# Altium PCB Interface.PcbDoc
Units mm, origin at the board's own origin, x right, y up, seen from the top; angles counter-clockwise.
Board outline 30.5 x 82 mm, 2 copper layers (Top Layer, Bottom Layer), stack 1.271 mm thick; 75 components, 43 nets, 233 pads, 361 vias.
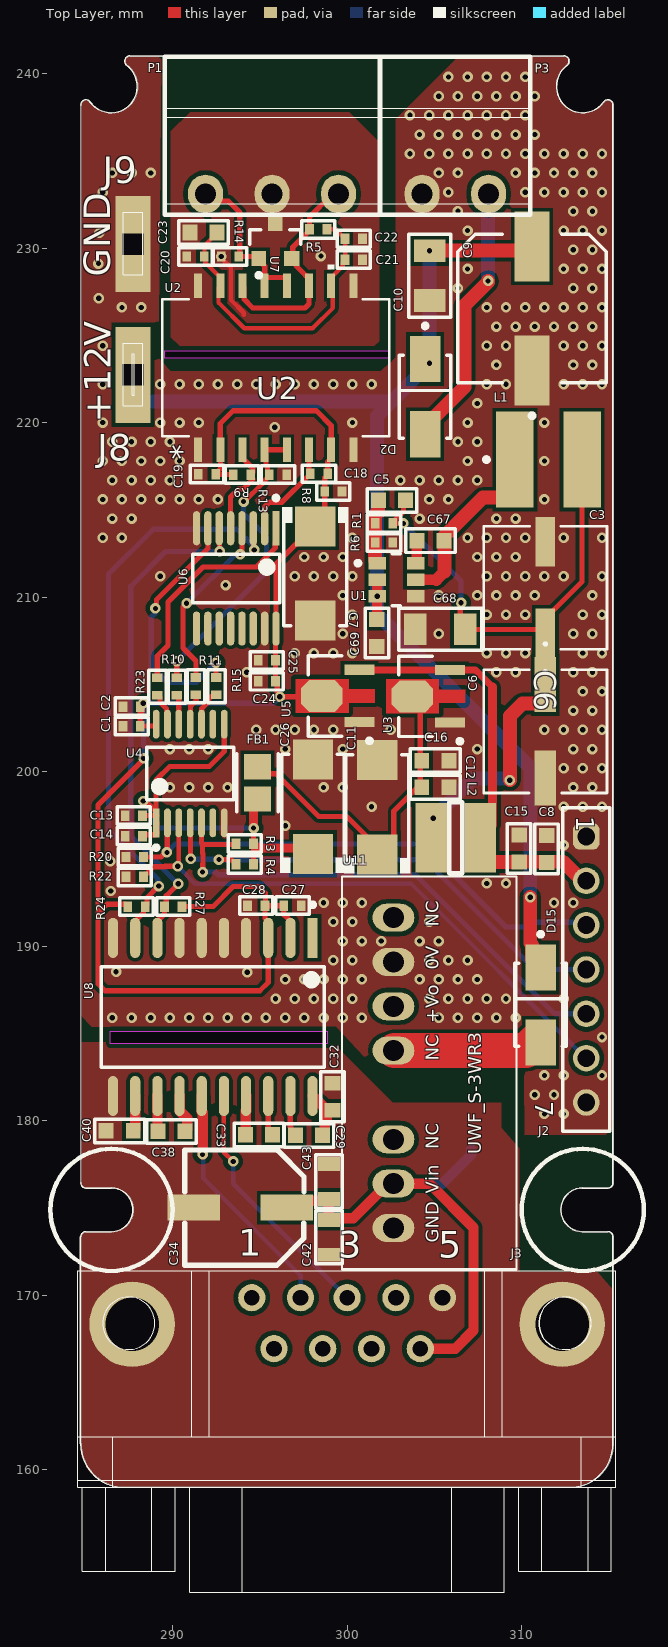
[diagram p0: Top Layer view]
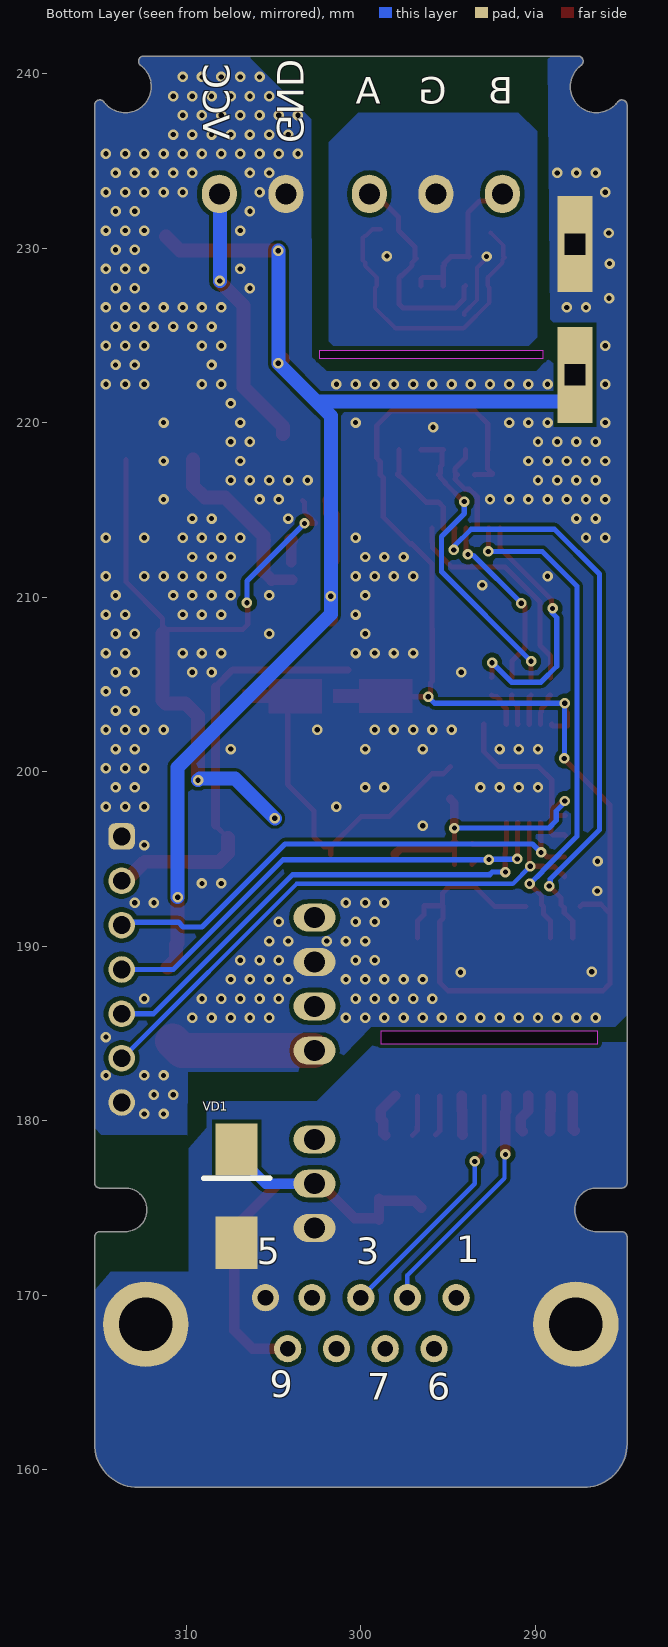
[diagram p1: Bottom Layer view, seen from below]
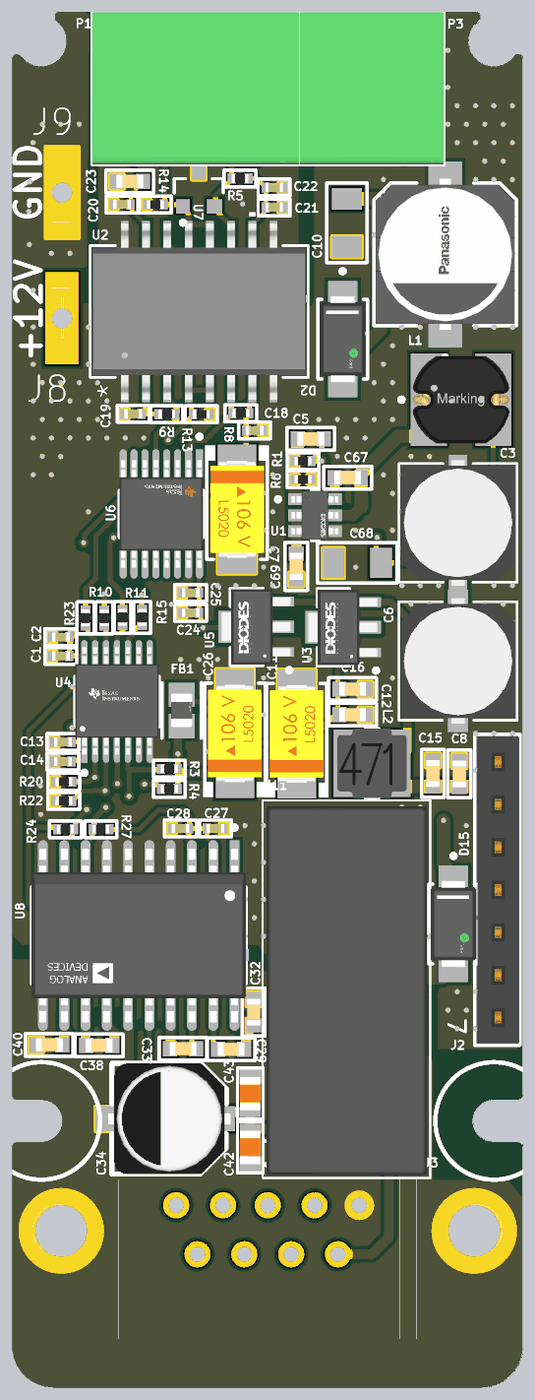
[diagram p2: 3D render of the assembled board from above, using the file's embedded part models]

## Layer stack, top to bottom
Top Solder: solder mask 0.0102, Solder Resist, Dk 3.5
Top Layer: signal copper 0.0356
Dielectric 1: dielectric 1.2, FR-4, Dk 4.8
Bottom Layer: signal copper 0.0356
Bottom Solder: solder mask 0.0102, Solder Resist, Dk 3.5

## Board outline
284.75,173.35 cw(c285.05,173.35) 285.05,173.65 286.5,173.65 ccw(c286.5,174.9) 286.5,176.15 285.05,176.15 cw(c285.05,176.45) 284.75,176.45 284.75,238.183 cw(c285.05,238.183) 285.292,238.361 ccw(c286.5,239.25) 287.389,240.458 cw(c287.567,240.7) 287.567,241 312.433,241 cw(c312.433,240.7) 312.611,240.458 ccw(c313.5,239.25) 314.708,238.361 cw(c314.95,238.183) 315.25,238.183 315.25,176.45 cw(c314.95,176.45) 314.95,176.15 313.5,176.15 ccw(c313.5,174.9) 313.5,173.65 314.95,173.65 cw(c314.95,173.35) 315.25,173.35 315.25,161.5 cw(c312.75,161.5) 312.75,159 287.25,159 cw(c287.25,161.5) 284.75,161.5
cut-out: 289.56,223.672 289.56,224.13 302.387,224.13 302.387,223.672
cut-out: 286.436,184.429 286.436,185.141 298.856,185.141 298.856,184.429
cut-out: 289.56,223.672 289.56,224.13 302.387,224.13 302.387,223.672

## Design rules (kind name [scope] priority, off if disabled: settings)
Clearance Clearance_1 [All] p1: gap=0.254 ignorepadtopadclearanceinfootprint=FALSE except(0.2: Arc-Fill Arc-Poly Arc-Region Track-Fill Track-Poly Track-Region SMDPad-SMDPad SMDPad-THPad SMDPad-Fill SMDPad-Poly SMDPad-Region)
Clearance [All] p2: gap=0.254 ignorepadtopadclearanceinfootprint=TRUE except(0.15: Via-Fill Via-Poly Via-Region; 0.2: Arc-Fill Arc-Poly Arc-Region Track-Fill Track-Poly Track-Region SMDPad-SMDPad SMDPad-Fill SMDPad-Poly SMDPad-Region)
ComponentClearance [All] p1: gap=-10 collisioncheckmode=3 verticalgap=0.1 showdistances=FALSE
HoleSize [All] p1: absolutevalues=TRUE maxlimit=4 minlimit=0.025 maxpercent=80.000 minpercent=20.000
PlaneClearance [All] p1: clearance=0.2
PlaneConnect [All] p1: planeconnectstyle=Direct reliefexpansion=0.508 reliefentries=4 reliefconductorwidth=0.254 reliefairgap=0.254
PolygonConnect [All] p1: connectstyle=Direct reliefconductorwidth=0.254 reliefentries=4 polygonreliefangle="90 Angle" airgapwidth=0.254
RoutingVias [All] p1: holewidth=0.3 width=0.6 viastyle="Through Hole" minholewidth=0.3 minwidth=0.6 maxholewidth=0.711 maxwidth=1.27
SilkToSilkClearance [All] p1: silktosilkclearance=0.1
SilkToSolderMaskClearance [IsPad] p1: minsilkscreentomaskgap=0.05 clearancetoexposedcopper=TRUE
SolderMaskExpansion SolderMaskExpansion_1 [All] p1: expansion=0.102 istentingtop=FALSE
SolderMaskExpansion Tented_Vias [IsVia] p2: expansion=0.102 istentingtop=TRUE
SupplyNets "Schematic Supply Nets_10" [InNet('VCC_2')] p1: voltage=0.000
SupplyNets "Schematic Supply Nets_8" [InNet('GND_ISOL')] p2: voltage=0.000
SupplyNets "Schematic Supply Nets_5" [InNet('3v3')] p3: voltage=0.000
SupplyNets "Schematic Supply Nets_4" [InNet('VCC')] p4: voltage=0.000
SupplyNets "Schematic Supply Nets_2" [InNet('+5V')] p5: voltage=0.000
SupplyNets "Schematic Supply Nets_1" [InNet('GND')] p6: voltage=0.000
SupplyNets "Schematic Supply Nets" [InNet('GND_2')] p7: voltage=0.000
Width [All] p1: maxlimit=3 minlimit=0.254 preferedwidth=0.254 minimp=50.000000 maximp=50.000000 favimp=50.000000
24 further rules are at their usual default settings.

## Components (designator, comment, footprint, x,y, rotation, side; value= is the part's Value field where it differs from the comment)
C1 "0.1uF 16V" CAP-0402 287.655,202.616 r180 top locked
C2 "2.2uF 16V" CAP-0402 287.655,203.733 r180 top locked
C3 "100uF 16V" CAP_A765EB_KEM-L 311.353,210.541 r90 top locked
C5 "100pF" CAP-0603 302.565,215.544 r180 top locked
C6 "100uF 16V" CAP_A765EB_KEM 311.353,202.311 r270 top locked
C7 "100uF_16V" CAP-TAN-C 298.171,211.353 r270 top locked
C8 "0.1uF" CAP-0603 311.429,195.58 r270 top locked
C9 "330uF 25V" CAP_SMD_Size_G 310.591,226.543 r90 top locked
C10 "10uF 50V" CAP-1206 304.724,228.422 r270 top locked
C11 "47uF_16V" CAP-TAN-C 301.727,197.968 r90 top locked
C12 "0.1uF" CAP-0603 305.054,199.111 r180 top locked
C13 "0.1uF 16V" CAP-0402 287.782,197.485 r180 top locked
C14 "2.2uF 16V" CAP-0402 287.782,196.317 r180 top locked
C15 "0.1uF" CAP-0603 309.855,195.605 r270 top locked
C16 "0.1uF" CAP-0603 305.054,200.635 r180 top locked
C18 "2.2uF 16V" CAP-0402 299.212,216.052 r0 top locked
C19 "0.1uF 16V" CAP-0402 291.973,217.043 r180 top locked
C20 "10nF" CAP-0402 291.313,229.514 r180 top locked
C21 "100nF" CAP-0402 300.38,229.337 r0 top locked
C22 "1nF" CAP-0402 300.38,230.53 r0 top locked
C23 "1uF" CAP-0603 291.77,230.886 r180 top locked
C24 "2.2uF 16V" CAP-0402 295.402,205.181 r180 top locked
C25 "0.1uF 16V" CAP-0402 295.402,206.375 r180 top locked
C26 "100uF_16V" CAP-TAN-C 298.044,197.993 r90 top locked
C27 "2.2uF 16V" CAP-0402 296.875,192.329 r0 top locked
C28 "0.1uF 16V" CAP-0402 294.792,192.329 r180 top locked
C29 "0.1uF 16V" CAP-0603 297.815,179.172 r0 top locked
C32 "0.1uF 16V" CAP-0603 299.161,181.381 r270 top locked
C33 "0.1uF 16V" CAP-0603 294.945,179.197 r0 top locked
C34 "100uF 50V" CAP_SMD_SIZE_D 294.132,175.031 r0 top locked
C38 "0.1uF 16V" CAP-0603 289.941,179.4 r0 top locked
C40 "0.1uF 16V" CAP-0603 286.969,179.426 r0 top locked
C42 "1 uF 25V" CAP-0805 298.958,173.33 r270 top locked
C43 "100 nF 25V" CAP-0805 298.958,176.53 r90 top locked
C67 "100nF" CAP-0603 304.775,213.233 r0 top locked
C68 "22uF 16V" CAP-1206 305.336,208.153 r180 top locked
C69 "100 nF 50V" CAP-0603 301.701,207.95 r270 top locked
D2 "SS14" DO-214-AC 304.47,221.488 r90 top locked
D15 "SS14" DO-214-AC 311.08,186.639 r90 top locked
FB1 "BLM21PG221SN1D" FP-BLM21-0_2-t0_85-e0_5-IPC_A 294.869,199.365 r90 top locked
J2 "61300711821" 61300711821 313.7,188.671 r270 top locked
J3 "'DB9公头" DB9-1 300,165.3 r0 top locked
J8 "1.2x3.7mm" Pad_conn_1.2x3.7mm#1 287.757,222.733 r90 top locked
J9 "1.2x3.7mm" Pad_conn_1.2x3.7mm#2 287.731,230.226 r90 top locked
L1 "12µH, 2A" WE-PD2_5848 311.531,217.881 r0 top locked
L2 "220uH" Coil_4.5x4.5_mm 306.222,196.215 r0 top locked
P1 "15EDGRS_3.81-3" 15EDGRC-3.81-3 295.7,233.1 r90 top locked
P3 "15EDGRC3_5-2" 16EDGRC_3.81-2 306.2,233.1 r90 top locked
R1 "270K" RES-0402 302.108,214.224 r180 top locked
R3 "10K" RES-0402 294.132,195.885 r180 top locked
R4 "10K" RES-0402 294.132,194.691 r180 top locked
R5 "10K" RES-0402 298.348,231.064 r0 top locked
R6 "30.1 K" RES-0402 302.108,213.131 r180 top locked
R8 "10K" RES-0402 298.391,217.068 r0 top locked
R9 "10K" RES-0402 293.98,217.018 r180 top locked
R10 "33R" RES-0402 290.246,204.876 r270 top locked
R11 "33R" RES-0402 291.338,204.902 r270 top locked
R13 "10K" RES-0402 296.037,217.018 r180 top locked
R14 "10K" RES-0402 293.294,229.514 r0 top locked
R15 "33R" RES-0402 292.506,204.902 r270 top locked
R20 "10K" RES-0402 287.832,195.115 r0 top locked
R22 "10K" RES-0402 287.832,193.972 r0 top locked
R23 "33R" RES-0402 289.128,204.876 r270 top locked
R24 "10K" RES-0402 287.934,192.278 r180 top locked
R27 "10K" RES-0402 290.043,192.278 r0 top locked
U1 "AP63200WU-7" FP-TSOT26-MFG 302.819,210.998 r0 top locked
U2 "ADM2687E" RI_16_2_ADI-L 295.91,223.139 r90 top locked
U3 "AMS1117-3.3" SOT-89 304.114,204.318 r90 top locked
U4 "TXU0304QPWRQ1" FP-PW0014A-IPC_B 291.008,199.898 r90 top locked
U5 "AMS1117" SOT-89 298.933,204.343 r90 top locked
U6 "TMUX1574PWR" TSSOP-16-A 293.649,211.074 r270 top locked
U7 "PSM712-LF-T7" PRKT-SOT23-3_V 295.885,230.403 r90 top locked
U8 "ADM3251EARWZ-REEL" FP-RW-20-IPC_B 292.303,185.953 r270 top locked
U11 "UWF1212S-3WR3" UWF_S-3WR3 302.65,182.753 r90 top locked
VD1 "SMBJ15A" DO-214AA 307.111,177.978 r270 bottom locked

## Footprints (in the part's own frame and the unit in brackets; to place one, negate y for a bottom-side part, rotate by r counter-clockwise, add the part's x,y. Pads: shape width x height; smd on the part's side, far side on the other; paste and mask are expansions set on the pad)
15EDGRC-3.81-3 [mm] "15EDGRC-3.81-3"
  oval 2.2x2 hole 1.2: 1(0,3.81) 2(0,0) 3(0,-3.81)
  silkscreen extent -1.19,-6.17 7.85,6.15, body extent -1.2,-6.15 7.87,6.15, height 7.2
16EDGRC_3.81-2 [mm] "16EDGRC_3.81-2"
  oval 2.2x2 hole 1.2: 1(0,1.905) 2(0,-1.905)
  silkscreen extent -1.19,-4.29 7.85,4.29, body extent -1.2,-4.3 7.87,4.3, height 7.2
61300711821 [mm] "Socket Header, Pitch 2.54 mm, THT, Vertical, single row, 7p"
  rrect50% 1.52x1.52 hole 1.02: 1(-7.62,0)
  round 1.52 hole 1.02: 2(-5.08,0) 3(-2.54,0) 4(0,0) 5(2.54,0) 6(5.08,0) 7(7.62,0)
  silkscreen extent -9.27,-1.35 9.27,1.35, body extent -9.14,-1.2 9.14,1.3, height 8.55
CAP-0402 [mm]
  rect 0.5x0.6 smd: 1(-0.5,0) 2(0.5,0)
  silkscreen extent -0.95,-0.5 0.95,0.5, body extent -0.52,-0.27 0.53,0.28, height 0.55
CAP-0603 [mm]
  rect 0.85x0.9 smd: 1(-0.775,0) 2(0.775,0)
  silkscreen extent -1.43,-0.67 1.43,0.67, body extent -0.8,-0.4 0.8,0.4, height 0.8
CAP-0805 [mm]
  rect 0.8x1.25 smd mask+0.015: 1(-1,0) 2(1,0)
  silkscreen extent -1.52,-0.76 1.52,0.76, body extent -1,-0.62 1,0.63, height 0.8
CAP-1206 [mm]
  rect 1.3x1.8 smd: 1(-1.425,0) 2(1.425,0)
  silkscreen extent -2.37,-1.2 2.37,1.2, body extent -1.68,-0.87 1.67,0.87, height 0.95
CAP-TAN-C [mm]
  rect 2.3x2.3 smd: 1(-2.7,0) 2(2.7,0)
  silkscreen extent -3.8,-1.9 3,1.9, body extent -2.9,-1.6 2.9,1.6, height 2.6
CAP_A765EB_KEM [mm]
  rect 3.143x1.213 smd paste+0 mask+0: 1(-2.675,0) 2(2.675,0)
  silkscreen extent -5.08,-3.53 3.53,3.53, body extent -3.75,-3.4 3.75,3.4, height 6.05
CAP_A765EB_KEM-L [mm]
  rect 2.843x1.113 smd paste+0 mask+0: 1(-2.625,0) 2(2.625,0)
  silkscreen extent -4.88,-3.53 3.53,3.53, body extent -3.75,-3.4 3.75,3.4, height 6.05
CAP_SMD_SIZE_D [mm] "CAP_SMD_SIZE_D"
  rect 3x1.5 smd: 1(2.413,0) 2(-2.921,0)
  silkscreen extent -3.43,-3.3 3.4,3.3, body extent -3.65,-3.3 3.65,3.3, height 7.7
CAP_SMD_Size_G [mm]
  rect 4x2 smd paste+0 mask+0: 1(3.55,0) 2(-3.55,0)
  silkscreen extent -6.27,-4.25 4.25,4.25, body extent -5.8,-4.5 5.8,4.5, height 0.25
Coil_4.5x4.5_mm [mm]
  rect 1.8x4 smd: 1(-1.397,0) 2(1.397,0)
  silkscreen extent -0.38,-2.03 0.38,2.03, body extent -2.07,-2.07 2.07,2.07, height 2.8
DB9-1 [mm] "DB9-1  PCB"
  round 1.56 hole 0.9: 1(-5.461,4.572) 2(-2.667,4.572) 3(0,4.572) 4(2.794,4.572) 5(5.461,4.572) 6(-4.191,1.651) 7(-1.397,1.651) 8(1.397,1.651) 9(4.191,1.651)
  round 4.9 hole 3.07: MH1(-12.319,3.048) MH2(12.319,3.048)
  body extent -15.41,-12.4 15.41,6, height 12.5
DO-214-AC [mm]
  rect 2.65x1.75 smd paste+0 mask+0: 1(-2.15,0) 2(2.15,0)
  silkscreen extent -2.37,-1.48 4.17,1.48, body extent -2.6,-1.36 2.6,1.36, height 2.5
DO-214AA [mm]
  rect 3x2.4 smd: 1(-0.381,0) 2(4.953,0)
  silkscreen extent 1.27,-1.91 1.27,1.9, body extent -0.53,-1.85 5.07,2.1, height 2.65
FP-BLM21-0_2-t0_85-e0_5-IPC_A [mm]
  rect 1.455x1.556 smd paste+0 mask+0: 1(-0.926,0) 2(0.926,0)
  silkscreen extent -1.65,-1.18 1.65,1.18, body extent -1,-0.63 1,0.63, height 1.05
FP-PW0014A-IPC_B [mm]
  rect 1.655x0.381 smd paste+0 mask+0: 1(-2.825,1.95)
  rrect100% 1.655x0.381 smd paste+0 mask+0: 2(-2.825,1.3) 3(-2.825,0.65) 4(-2.825,0) 5(-2.825,-0.65) 6(-2.825,-1.3) 7(-2.825,-1.95) 8(2.825,-1.95) 9(2.825,-1.3) 10(2.825,-0.65) 11(2.825,0) 12(2.825,0.65) 13(2.825,1.3) 14(2.825,1.95)
  silkscreen extent -4.37,-2.5 1.5,2.5, body extent -3.9,-2.75 3.9,2.75, height 0.25
FP-RW-20-IPC_B [mm]
  rect 2.298x0.582 smd paste+0 mask+0: 1(-4.528,5.715)
  rrect100% 2.298x0.582 smd paste+0 mask+0: 2(-4.528,4.445) 3(-4.528,3.175) 4(-4.528,1.905) 5(-4.528,0.635) 6(-4.528,-0.635) 7(-4.528,-1.905) 8(-4.528,-3.175) 9(-4.528,-4.445) 10(-4.528,-5.715) 11(4.528,-5.715) 12(4.528,-4.445) 13(4.528,-3.175) 14(4.528,-1.905) 15(4.528,-0.635) 16(4.528,0.635) 17(4.528,1.905) 18(4.528,3.175) 19(4.528,4.445) 20(4.528,5.715)
  silkscreen extent -6.55,-6.4 2.88,6.4, body extent -5.93,-6.65 5.93,6.65, height 0.25
FP-TSOT26-MFG [mm]
  rect 1x0.7 smd paste+0 mask+0: 1(-1.099,0.95) 2(-1.099,0) 3(-1.099,-0.95) 4(1.099,-0.95) 5(1.099,0) 6(1.099,0.95)
  silkscreen extent -2.32,-1.5 0.22,1.5, body extent -1.4,-1.45 1.4,1.45, height 1
Pad_conn_1.2x3.7mm#1 [mm]
  rect 5.5x2 hole 1.2 square: 1(0,0.026)
Pad_conn_1.2x3.7mm#2 [mm]
  rect 5.5x2 hole 1.2 square: 1(0,0)
PRKT-SOT23-3_V [mm] "SOT23, 3-Leads, Body 2.92x1.3mm, Pitch 0.94mm"
  rect 0.84x0.84 smd: 1(-1,0.94) 3(1,0)
  rect 0.84x0.9 smd: 2(-1,-0.94)
  silkscreen extent -2.09,-1.46 0.65,1.46, body extent -0.65,-1.46 0.65,1.46, height 1.17
RES-0402 [mm]
  rect 0.5x0.6 smd: 1(-0.5,0) 2(0.5,0)
  silkscreen extent -0.95,-0.5 0.95,0.5, body extent -0.5,-0.25 0.5,0.25, height 0.35
RI_16_2_ADI-L [mm]
  rect 1.41x0.46 smd paste+0 mask+0: 1(-4.7,4.445) 2(-4.7,3.175) 3(-4.7,1.905) 4(-4.7,0.635) 5(-4.7,-0.635) 6(-4.7,-1.905) 7(-4.7,-3.175) 8(-4.7,-4.445) 9(4.7,-4.445) 10(4.7,-3.175) 11(4.7,-1.905) 12(4.7,-0.635) 13(4.7,0.635) 14(4.7,1.905) 15(4.7,3.175) 16(4.7,4.445)
  silkscreen extent -3.93,-6.5 5.91,6.5, body extent -5.26,-6.38 5.26,6.38, height 2.64
SOT-89 [mm]
  rect 0.58x1.73 smd paste+0 mask+0: 1(-1.5,-1.781) 3(1.5,-1.781)
  oct 1.827x2.394 smd paste+0 mask+0: 2(0,0.381)
  Top Layer region: -0.38,-2.646 -0.38,-1.146 -0.967,-1.146 -0.967,1.884 0.967,1.884 0.967,-1.146 0.38,-1.146 0.38,-2.646
  silkscreen extent -2.7,-2.47 2.3,1.15, body extent -2.25,-2.42 2.25,1.68, height 1.6
TSSOP-16-A [mm] "TSSOP-16 pacadge"
  rect 1.955x0.421 smd paste+0 mask+0: 1(-2.875,2.275)
  rrect100% 1.955x0.421 smd paste+0 mask+0: 2(-2.875,1.625) 3(-2.875,0.975) 4(-2.875,0.325) 5(-2.875,-0.325) 6(-2.875,-0.975) 7(-2.875,-1.625) 8(-2.875,-2.275) 9(2.875,-2.275) 10(2.875,-1.625) 11(2.875,-0.975) 12(2.875,-0.325) 13(2.875,0.325) 14(2.875,0.975) 15(2.875,1.625) 16(2.875,2.275)
  silkscreen extent -4.73,-2.5 1.4,2.5, body extent -4.35,-3 4.35,3, height 0.25
UWF_S-3WR3 [mm]
  oval 1.6x2.4 hole 1.2: 1(-8.89,0) 2(-6.35,0) 3(-3.81,0) 5(1.27,0) 6(3.81,0) 7(6.35,0) 8(8.89,0)
  silkscreen extent -11.25,-7.05 11.25,2.95, body extent -11.09,-6.87 10.91,2.73, height 12
WE-PD2_5848 [mm] "SMD Power Inductor, 2-Leads, body 5.8x5.2mm"
  rect 2.15x5.5 smd: 1(-1.925,0) 2(1.925,0)
  silkscreen extent -3.67,-0.12 -3.42,0.12, body extent -2.9,-2.6 2.89,2.6, height 4.48

## Part data
C1 C13 C19 C25 C28: library part CAP-NON-POLAR, "0.1uF 16V X7R / GRM155R71C104KA88D"
C2 C14 C18 C24 C27: library part CAP-NON-POLAR, "2.2uF 16V X5R GRM155R61C225KE11D"
C3 C6: library part CAP_POL_SMD, "KEMET A765EB107M1CLAE025 /  / 100uF 16V 25mΩ 125mA@120Hz ±20% SMD,D6.3xL6mm Aluminum"
C5: library part CAP-NON-POLAR, "100pF 50V  C0G   Murata GRM1885C1H101JA01D"
C7 C9 C26: library part CAP_POL_SMD
C8 C12 C15 C16 C20 C21 C22 C23 C29 C32 C33 C38 C40: library part CAP-NON-POLAR
C10: library part CAP-NON-POLAR, "10uF 50V X7R  Yageo  CC1206KKX7R9BB106"
C11: library part CAP-POLAR
C34: library part CAP_POL_SMD, "100uF 50V  JVJ50V100M6x8"
C42: library part CAP-NON-POLAR, "1 uF 25V X7R"
C43: library part CAP-NON-POLAR, "100 nF 25V X7R"
C67: library part CAP-NON-POLAR, "100nF  50V  X7R  Murata GRM188R71H104KA93D"
C68: library part CAP-NON-POLAR, "22uF 16V   X7R   Murata GRM31CZ71C226ME15L"
C69: library part CAP-NON-POLAR, "100 nF 50V  X7R  GCM188R71H104KA57J"
FB1: "Chip Ferrite Bead, 0805, 220Ω @ 100MHz, 0.045Ω, 25%, 2A"
J2: "WR-PHD Socket Header, THT, Vertical, pitch 2.54mm, 1 Row, 7P", Contact Resistance=20mΩ, Manufacturer="Wurth Elektronik", Operating Temperature Max=125°C, Operating Temperature Min=-40°C, Rated Current=3A, Withstanding Voltage=500V, Working Voltage=250V, Category="Board-to-Board Connectors", ComponentLink1Description="Website Link", ComponentLink1URL=https://www.we-online.com/redexpert/article/61300711821?ad, ComponentLink2Description="Datasheet Link", ComponentLink2URL=https://www.we-online.com/redexpert/spec/61300711821?ad, Gender="Socket Header", Manufacturer Part Number=61300711821, Match Code=WR-PHD, Mount="Through Hole", Number of Pins=7, Number of Rows=1, Orientation=Vertical, Packaging=Tray, Pitch=2.54mm
J3: library part DB9, "D-DMR009PM-D002  Ckmtw /  / 9P/弯插/公"
J8 J9: library part Klema_15_A
L1: library part 744774112, "WE-PD2 SMT Power Inductor, size 5848, 12µH, 2A, 0.11Ω", Case/Size Code=5848, DC Resistance=0.082Ω, DC Resistance Max=0.11Ω, Inductance=12µH, Manufacturer="Wurth Elektronik", Operating Temperature Max=125°C, Operating Temperature Min=-40°C, Rated Current=2A, Saturation Current=1.94A, Self Resonant Frequency=24MHz, Category="Unshielded Power Inductors", ComponentLink1Description="Website Link", ComponentLink1URL=https://www.we-online.com/redexpert/article/744774112?ad, ComponentLink2Description="Datasheet Link", ComponentLink2URL=https://www.we-online.com/redexpert/spec/744774112?ad, Height=4.5mm, Length=5.8mm, Manufacturer Part Number=744774112, Match Code=WE-PD2, Mount="Surface Mount", Packaging="Tape and Reel", Width=5.2mm, Simulation ModelName=5848_744774112_12u, Simulation ModelText=".subckt 5848_744774112_12u 1 2 / Rp 1 2 22000 / Cp 1 2 3p / Rs 1 N3 0.065 / L1 N3 2 12u / .ends 5848_744774112_12u", Simulation PortMap=(1:1),(2:2)
L2: library part Coil
R1 R3 R4 R5 R8 R9 R10 R11 R13 R14 R15 R20 R22 R23 R24 R27: library part RES-CONST
R6: library part RES-CONST, "30,1 K, 1%"
U1: "AP63200WU-7  IC REG BUCK ADJUSTABLE 2A TSOT26"
U3: library part AMS1117
U4: "Translation - Voltage Levels Automotive four chan nel unidirectional"
U7: library part CMP-2000-07553-1, "TVS Array - Asymmetrical Data Line Protector, 600 W, 7.5 V, -55 to 150 degC, 3-Pin SOT23, RoHS, Tape and Reel", Capacitance=75pF, Case\/Package=SOT-23, Clamping Voltage=17V, Current=20uA, Manufacturer="Protek Devices", Max Operating Temperature=150degC, Min Breakdown Voltage=7.5V, Min Operating Temperature=-55degC, Package Description="3-Pin Small Outline Transistor, Body 2.92 x 1.3 mm, Pitch 0.94 mm", Package Reference=SOT23-3, Power Dissipation=600W, Voltage=12V, Working Voltage=7V, Datasheet URL=www.protekdevices.com/xyz/documents/datasheets/psm712.pdf, Datasheet Version=10/2013, Depth=1.4mm, Direction=Bidirectional, Element Configuration=Dual, Lead Free=LeadFree, Leakage Current=20uA, Length=3.04mm, Manufacturer URL=http://www.protekdevices.com/, Mounting Technology=SurfaceMount, Number of Pins=3, Packaging=TapeandReel, Radiation Hardening=No, RoHSCompliant=True
U8: "DGTL ISO 2.5KV 2CH RS232 20SOIC"
U11: library part UWF_S-3WR3
VD1: library part ESD_Unidirect

## Via types
v1: diameter 0.6, hole 0.3, Top Layer to Bottom Layer, tented both sides, 361 vias

## Nets (pads, with @x,y where several pads share a name; then routed paths per layer and width w, separated by ;. In a path a pad name is that pad's centre, name@x,y a point inside that pad or via, vN(x,y) a via of type N, cw(c..) or ccw(c..) an arc to the next point about the centre after c; other vN are vias at no path point)
3v3: C13.1 C14.1 C26.1 FB1.1 R3.1 R4.1 U4.1 U4.8 | length 26.5
  Top Layer w0.3: C14.1 288.36,196.395 289.017,196.395 289.098,196.476 U4.1@289.098,197.073 ; C13.1 U4.1@289.098,197.485 ; v1(288.315,198.323) 288.373,198.266 288.502,198.266 U4.1@289.058,197.71 ; U4.1 U4.1@289.058,197.71 ; U4.8 292.958,201.162 292.1,200.304 289.839,200.304 289.058,199.523 U4.1@289.058,197.71 ; R4.1 R3.1@294.632,195.635 ; R3.1 294.632,196.766 v1(294.64,196.774)
  Top Layer w0.5: R3.1 294.882,195.635 297.701,195.635 C26.1 ; v1(294.64,196.774) 294.64,198.21 FB1.1
  Bottom Layer w0.3: v1(288.315,198.323) 288.315,198.242 288.8,197.757 288.8,197.201 289.228,196.774 v1(294.64,196.774)
+5V: C1.1 C2.1 C7.1 C18.1 C19.1 C24.1 C25.1 C27.1 C28.1 R8.2 R9.2 R24.2 R27.2 U2.2 U2.7 U4.14 U5.2 U6.16 U8.2 U8.3 | length 83.6
  Top Layer w0.3: R24.2 287.307,192.405 286.258,192.405 285.725,191.872 ; C2.1@288.258,203.828 288.258,203.469 288.155,203.366 C1.1 289.02,202.616 289.058,202.653 U4.14 ; v1(288.341,200.762) 288.341,200.708 285.725,198.092 285.725,191.872 ; R27.2 292.329,192.278 293.472,193.421 294.945,193.421 295.326,193.04 295.326,192.362 C28.1 ; R9.2 293.467,217.03 292.486,217.03 C19.1 292.473,217.093 292.739,217.359 292.739,218.435 U2.2 292.735,219.939 293.472,220.675 298.247,220.675 299.085,219.837 299.085,217.964 298.891,217.77 298.891,217.018 298.712,216.839 C18.1 ; U8.2 296.748,191.44 296.375,191.813 C27.1 C28.1 ; U5.2 298.272,204.343 298.221,204.292 v1(296.139,204.292) 296.139,204.373 296.002,204.51 296.002,205.081 C24.1 C25.1 295.902,208.176 U6.16 295.924,211.901 297.077,213.053 297.171,213.053 298.712,214.595 C18.1@298.712,215.952 ; 285.725,191.872 285.725,187.858 286.131,187.452 294.996,187.452 295.478,187.935 295.478,191.416 295.292,191.601 C28.1
  Bottom Layer w0.3: v1(288.341,200.762) 288.328,200.774 288.328,203.904 v1(288.315,203.917) 295.763,203.917 v1(296.139,204.292)
GND: C1.2 C2.2 C3.2 C6.2 C7.2 C8.1 C9.2 C10.2 C11.2 C12.1 C13.2 C14.2 C15.1 C16.1 C18.2 C19.2 C24.2 C25.2 C26.2 C27.2 C28.2 C68.2 C69.2 J2.1 J2.7 J9.1 P3.1 R6.1 R13.1 R20.1 R22.1 U1.4 U2.1 U2.8 U3.1 U4.7 U5.1 U6.8 U6.15 U8.4 U8.5 U8.6 U8.7 U8.10 U11.7
  other v1: 311.3,180.4 312.4,180.4 310.75,181.5 311.85,181.5 311.3,182.6 312.4,182.6 314.6,182.6 314.6,184.8 286.55,185.9 287.65,185.9 288.75,185.9 289.85,185.9 290.95,185.9 292.05,185.9 293.15,185.9 294.25,185.9 295.35,185.9 296.45,185.9 297.55,185.9 298.65,185.9 299.75,185.9 300.85,185.9 305.25,185.9 306.35,185.9 307.45,185.9 308.55,185.9 309.65,185.9 295.9,187 297,187 298.1,187 299.2,187 300.3,187 304.7,187 305.8,187 306.9,187 308,187 309.1,187 312.4,187 296.45,188.1 297.55,188.1 298.65,188.1 299.75,188.1 300.85,188.1 304.15,188.1 305.25,188.1 306.35,188.1 307.45,188.1 294.284,188.519 286.766,188.544 299.2,189.2 300.3,189.2 304.7,189.2 305.8,189.2 306.9,189.2 299.75,190.3 300.85,190.3 301.95,190.3 304.15,190.3 305.25,190.3 299.2,191.4 300.3,191.4 304.7,191.4 298.65,192.5 299.75,192.5 300.85,192.5 311.85,192.5 312.95,192.5 286.461,193.167 308,193.6 309.1,193.6 286.436,194.869 312.4,195.8 296.45,196.9 301.4,198 312.4,198 313.5,198 314.6,198 289.85,199.1 290.95,199.1 292.05,199.1 293.15,199.1 298.65,199.1 299.75,199.1 312.95,199.1 314.05,199.1 312.4,200.2 313.5,200.2 314.6,200.2 289.85,201.3 290.95,201.3 292.05,201.3 296.45,201.3 299.75,201.3 307.45,201.3 312.95,201.3 314.05,201.3 294.8,202.4 295.9,202.4 297,202.4 298.1,202.4 299.2,202.4 302.5,202.4 311.3,202.4 312.4,202.4 313.5,202.4 314.6,202.4 312.95,203.5 314.05,203.5 313.5,204.6 314.6,204.6 294.25,205.7 308.55,205.7 309.65,205.7 312.95,205.7 314.05,205.7 297,206.8 298.1,206.8 299.2,206.8 300.3,206.8 308,206.8 309.1,206.8 310.2,206.8 313.5,206.8 314.6,206.8 299.75,207.9 305.25,207.9 312.95,207.9 314.05,207.9 300.3,209 308,209 309.1,209 310.2,209 313.5,209 314.6,209 299.75,210.1 305.25,210.1 307.45,210.1 308.55,210.1 309.65,210.1 310.75,210.1 314.05,210.1 293.04,210.693 289.3,211.2 297,211.2 298.1,211.2 299.2,211.2 300.3,211.2 308,211.2 309.1,211.2 310.2,211.2 311.3,211.2 312.4,211.2 314.6,211.2 297.55,212.3 298.65,212.3 299.75,212.3 307.45,212.3 308.55,212.3 309.65,212.3 286,213.4 287.1,213.4 300.3,213.4 306.9,213.4 308,213.4 309.1,213.4 310.2,213.4 312.4,213.4 314.6,213.4 286.55,214.5 287.65,214.5 304.15,214.5 308.55,214.5 309.65,214.5 286,215.6 287.1,215.6 288.2,215.6 289.3,215.6 290.4,215.6 291.5,215.6 292.6,215.6 304.7,215.6 305.8,215.6 311.3,215.6 286.55,216.7 287.65,216.7 288.75,216.7 289.85,216.7 303.05,216.7 304.15,216.7 305.25,216.7 306.35,216.7 307.45,216.7 286,217.8 287.1,217.8 288.2,217.8 289.3,217.8 290.4,217.8 306.9,217.8 311.3,217.8 286.55,218.9 287.65,218.9 288.75,218.9 289.85,218.9 306.35,218.9 307.45,218.9 295.859,219.735 286,220 289.3,220 290.4,220 291.5,220 300.3,220 306.9,220 311.3,220 307.45,221.1 286,222.2 289.3,222.2 290.4,222.2 291.5,222.2 292.6,222.2 293.7,222.2 294.8,222.2 295.9,222.2 297,222.2 298.1,222.2 299.2,222.2 300.3,222.2 301.4,222.2 308,222.2 309.1,222.2 312.4,222.2 313.5,222.2 314.6,222.2 308.55,223.3 312.95,223.3 314.05,223.3 286,224.4 308,224.4 309.1,224.4 312.4,224.4 313.5,224.4 314.6,224.4 308.55,225.5 309.65,225.5 310.75,225.5 311.85,225.5 312.95,225.5 314.05,225.5 287.1,226.6 288.2,226.6 308,226.6 309.1,226.6 310.2,226.6 311.3,226.6 312.4,226.6 313.5,226.6 314.6,226.6 285.775,227.127 306.35,227.7 312.95,227.7 314.05,227.7 306.9,228.8 312.4,228.8 313.5,228.8 314.6,228.8 285.75,229.108 312.95,229.9 314.05,229.9 285.801,230.861 306.9,231 312.4,231 313.5,231 314.6,231 306.35,232.1 312.95,232.1 314.05,232.1 286,233.2 305.8,233.2 310.2,233.2 311.3,233.2 312.4,233.2 313.5,233.2 314.6,233.2 286.55,234.3 287.65,234.3 288.75,234.3 305.25,234.3 306.35,234.3 309.65,234.3 310.75,234.3 311.85,234.3 312.95,234.3 314.05,234.3 303.6,235.4 304.7,235.4 305.8,235.4 306.9,235.4 308,235.4 309.1,235.4 310.2,235.4 311.3,235.4 312.4,235.4 313.5,235.4 314.6,235.4 304.15,236.5 305.25,236.5 306.35,236.5 307.45,236.5 308.55,236.5 309.65,236.5 310.75,236.5 303.6,237.6 304.7,237.6 305.8,237.6 306.9,237.6 308,237.6 309.1,237.6 310.2,237.6 305.25,238.7 306.35,238.7 307.45,238.7 308.55,238.7 309.65,238.7 310.75,238.7 305.8,239.8 306.9,239.8 308,239.8 309.1,239.8 310.2,239.8
GND_2: C32.1 C34.2 C40.1 C42.2 C43.2 J3.5 J3.MH1 J3.MH2 U8.11 U11.1 VD1.2
GND_ISOL: C20.2 C21.2 C22.2 C23.2 P1.2 R14.1 U2.9 U2.16 U7.3 | length 3.9
  Top Layer w0.254: R14.1@292.794,229.464 v1(292.794,229.514) 292.917,229.391 292.917,229.303 293.346,228.873 293.346,227.024 294.081,226.289 294.081,226.162
  other v1: 298.501,229.54
NetC3_1: C3.1 C5.1 C6.1 C68.1 L1.2 L2.1 R1.1 | length 40.1
  Top Layer w0.3: R1.1 v1(303.225,214.224) ; R1.1@302.608,214.274 303.228,214.894 303.228,215.433 C5.1 ; v1(306.527,209.677) 306.476,209.626 306.476,208.438 C68.1 311.158,208.153 311.353,208.348 311.353,208.781 313.456,210.884 L1.2
  Top Layer w0.8: v1(309.321,199.517) 309.321,203.2 310.036,203.914 311.197,203.914 311.353,204.071 311.353,204.936 C3.1
  Bottom Layer w0.3: v1(303.225,214.224) 306.527,210.922 v1(306.527,209.677)
  Bottom Layer w0.8: v1(304.927,197.333) 307.213,199.619 309.22,199.619 v1(309.321,199.517)
NetC5_2: C5.2 R1.2 R6.2 U1.1 | length 3.7
  Top Layer w0.8: U1.1@301.719,212.002 301.608,212.114 R6.2 301.608,214.698 301.765,214.856 301.765,215.519 C5.2
NetC11_1: C11.1 C12.2 C16.2 FB1.2 U3.2 | length 19.3
  Top Layer w0.3: FB1.2 295.272,199.887 295.921,199.887 298.374,197.434 299.974,197.434 C11.1@301.727,195.682 ; C11.1 301.727,195.707 302.114,195.707 302.675,196.268 302.675,197.748 304.19,199.263 304.19,200.635 304.19,203.86 U3.2
NetC20_1: C20.1 C21.1 C22.1 C23.1 R5.2 U2.10 U2.15 | length 18
  Top Layer w0.254: C20.1@291.762,229.464 291.885,229.341 291.885,229.164 292.735,228.314 U2.15 292.632,227.736 292.632,226.874 294.107,225.4 298.018,225.4 299.187,226.568 299.187,227.737 U2.10 299.085,228.314 299.757,228.986 299.757,229.164 299.88,229.287 299.88,230.58 299.757,230.703 299.707,230.703 299.347,231.064 R5.2 ; C20.1 291.828,229.53 291.828,230.145 292.545,230.861 C23.1
NetC29_1: C29.1 U8.19 | length 2.4
  Top Layer w0.3: U8.19 296.748,179.647 296.765,179.631 296.765,179.447 C29.1
NetC29_2: C29.2 C32.2 U8.20 | length 2.7
  Top Layer w0.6: U8.20 298.846,180.598 298.846,180.101 298.715,179.97 298.715,179.297 C29.2
NetC33_1: C33.1 U8.17 | length 2.2
  Top Layer w0.6: C33.1 294.199,179.226 294.199,180.576 294.208,180.585 U8.17
NetC33_2: C33.2 U8.18 | length 2.3
  Top Layer w0.3: U8.18 295.478,179.439 C33.2
NetC34_1: C34.1 C42.1 C43.1 J3.9 U11.2 VD1.1 | length 28.8
  Top Layer w0.6: C34.1 296.944,175.43 298.858,175.43 C43.1 ; C42.1 299.058,174.43 300.344,174.43 302.317,176.403 302.717,176.403 304.724,176.403 307.238,173.888 307.238,167.996 306.194,166.951 J3.9 ; C42.1 C43.1
  Bottom Layer w0.6: U11.2@302.717,176.403 305.456,176.403 307.111,178.059 VD1.1
NetC38_1: C38.1 U8.13 | length 2
  Top Layer w0.6: U8.13 289.128,180.585 289.137,180.576 289.137,179.429 C38.1
NetC38_2: C38.2 U8.14 | length 2.3
  Top Layer w0.6: U8.14 290.398,180.585 290.845,180.139 290.845,179.819 290.841,179.815 290.841,179.525 C38.2
NetC40_2: C40.2 U8.12 | length 2
  Top Layer w0.6: C40.2 287.849,179.531 287.849,181.416 U8.12
NetC67_1: C67.1 U1.6 | length 1.2
  Top Layer w0.6: U1.6@303.997,212.002 C67.1@303.997,213.231
  Top Layer w0.8: C67.1@303.997,213.231 C67.1
NetC67_2: C67.2 L1.1 U1.5 | length 10.6
  Top Layer w0.6: U1.5 305.105,210.998
  Top Layer w0.7: 305.105,210.998 305.587,211.48
  Top Layer w0.8: 305.587,211.48 305.587,212.143 305.575,212.156 305.575,213.208 305.547,213.235 305.575,213.263 305.575,213.5 307.772,215.697 308.931,215.697 309.606,216.372 L1.1
NetD2_1: D2.1 P3.2 | length 15.3
  Top Layer w0.8: D2.1 304.47,219.788 306.73,222.049 306.73,226.72 308.077,228.067 v1(308.077,228.117)
  Bottom Layer w0.8: v1(308.077,228.117) 308.077,233.072 P3.2
NetD15_1: D15.1 U11.5 | length 8.3
  Top Layer w2: U11.5@302.717,184.023 310.236,184.023 D15.1@310.794,184.582
NetJ2_3: J2.3 R20.2 U4.2 | length 29.5
  Top Layer w0.3: R20.2 289.334,195.115 289.596,195.377 v1(289.677,195.377) ; v1@289.692,195.361 289.692,197.057 U4.2
  Bottom Layer w0.3: v1(289.677,195.377) 290.158,195.858 304.344,195.858 309.093,191.11 310.18,191.11 310.452,191.382 313.494,191.382 J2.3@313.665,191.211
NetJ2_4: J2.4 R4.2 U4.4 | length 28.4
  Top Layer w0.3: U4.4 291.023,197.057 291.023,195.02 v1(291.039,195.004) ; v1(292.659,194.97) 293.353,194.97 293.482,194.841 293.532,194.841 293.632,194.741 R4.2
  Bottom Layer w0.3: v1(291.039,195.004) 291.056,194.987 292.63,194.987 292.659,194.958 304.46,194.958 310.748,188.671 J2.4@313.665,188.671
NetJ2_5: J2.5 R3.2 U4.5 | length 30.1
  Top Layer w0.3: U4.5 291.658,195.895 291.719,195.834 ; v1@291.712,194.261 291.732,194.281 291.732,194.702 291.743,194.713 291.743,195.296 291.712,195.327 291.712,195.834 293.581,195.834 R3.2
  Bottom Layer w0.3: v1(291.719,194.254) 292.469,194.254 292.619,194.104 303.902,194.104 311.876,186.131 J2.5@313.665,186.131
NetJ2_6: J2.6 R22.2 U4.3 | length 32.7
  Top Layer w0.254: v1(290.298,194.579) 290.358,194.638 U4.3
  Top Layer w0.3: R22.2 288.332,194.022 288.432,194.122 288.482,194.122 288.921,194.561 289.563,194.561 289.581,194.579 v1(290.298,194.579)
  Bottom Layer w0.254: v1(290.298,194.579) 291.304,193.573 303.682,193.573 J2.6@313.665,183.591
NetJ3_2: J3.2 U8.15 | length 13.9
  Top Layer w0.6: U8.15 291.668,180.523 291.719,180.472 v1(291.719,178.079)
  Bottom Layer w0.254: v1(291.719,178.079) 291.77,178.029 291.77,176.708 297.333,171.145 J3.2
NetJ3_3: J3.3 U8.16 | length 14.5
  Top Layer w0.254: U8.16 292.938,178.206 v1(293.472,177.673)
  Bottom Layer w0.254: v1(293.472,177.673) 293.472,176.4 J3.3
NetP1_1: P1.1 R14.2 U2.12 U2.13 U7.1 | length 10.4
  Top Layer w0.3: P1.1@291.694,232.994 291.999,232.689 293.193,232.689 293.855,232.027 293.855,229.525 R14.2@293.819,229.489 ; R14.2 294.834,229.514 U7.1 ; U7.1@294.97,229.378 295.215,229.133 295.215,229.018 295.275,228.958 295.275,228.417 U2.13 ; U2.13@295.275,228.314 296.465,228.314 296.545,228.234 U2.12
  Bottom Layer w0.254: P1.1@291.694,232.994 P1.1@291.694,233.69
NetP1_3: P1.3 R5.1 U2.11 U2.14 U7.2 | length 13.4
  Top Layer w0.3: U2.14 294.085,227.759 294.085,227.072 294.589,226.568 297.586,226.568 297.815,226.797 297.815,228.314 297.712,228.417 297.633,228.417 297.097,228.953 297.097,228.983 297.071,229.009 297.071,229.157 U7.2 296.89,229.469 296.89,230.056 297.848,231.014 297.848,231.778 299.065,232.994 P1.3@299.314,232.994
  Bottom Layer w0.254: P1.3@299.314,232.994 P1.3@299.314,233.74
NetR8_1: R8.1 U2.6 U6.2 | length 6.1
  Top Layer w0.3: U6.2 295.274,215.166 295.551,215.443 296.266,215.443 297.741,216.918 297.791,216.918 297.891,217.018 R8.1 297.815,217.145 U2.6
NetR9_1: R9.1 U2.3 U6.5 | length 5.5
  Top Layer w0.3: U6.5 293.324,215.727 293.776,216.179 294.03,216.179 294.608,216.757 294.58,216.786 R9.1@294.58,217.018 ; U2.3 294.005,217.964 294.608,217.361 294.608,217.168 294.608,217.146 R9.1
NetR10_1: R10.1 R13.2 U2.4 U2.5 | length 17.7
  Top Layer w0.3: R10.1 v1(290.246,206.324) ; v1(294.068,215.475) 294.11,215.475 295.162,216.528 295.162,216.57 295.437,216.844 295.437,216.918 R13.2 295.437,217.118 295.437,217.498 295.355,217.58 295.355,218.359 U2.4 U2.5
  Bottom Layer w0.3: v1(290.246,206.324) 295.382,211.461 295.382,213.476 294.068,214.79 v1(294.068,215.475)
NetR10_2: R10.2 U4.12 | length 1.7
  Top Layer w0.3: R10.2 290.258,204.376 290.358,204.276 U4.12
NetR11_1: R11.1 U6.4 | length 10.4
  Top Layer w0.3: v1(290.805,209.652) 290.601,209.448 290.601,207.086 291.338,206.35 R11.1 ; v1(293.864,212.447) 293.864,212.528 293.974,212.638 U6.4
  Bottom Layer w0.3: v1(290.805,209.652) 293.542,212.389 293.807,212.389 v1(293.864,212.447)
NetR11_2: R11.2 U4.11 | length 1.8
  Top Layer w0.3: U4.11 291.023,202.739 291.023,203.749 291.363,204.089 291.363,204.376 R11.2
NetR15_1: R15.1 U6.7 | length 14.7
  Top Layer w0.3: v1(289.016,209.357) 289.074,209.414 289.074,209.847 292.024,212.798 U6.7 ; v1(292.481,206.248) 292.481,205.427 R15.1
  Bottom Layer w0.3: v1(289.016,209.357) 289.029,209.344 289.029,209.096 288.773,208.839 288.773,206.045 289.687,205.13 291.363,205.13 v1(292.481,206.248)
NetR15_2: R15.2 U4.10 | length 2.1
  Top Layer w0.3: U4.10 291.673,202.739 291.673,203.615 292.042,203.984 292.042,204.126 292.218,204.302 292.406,204.302 R15.2
NetR23_1: R23.1 U6.1 | length 13.2
  Top Layer w0.3: R23.1 289.128,206.629 289.738,207.239 289.738,209.728 291.744,211.734 294.792,211.734 295.889,212.831 295.889,213.122 295.924,213.157 U6.1
NetR23_2: R23.2 U4.13 | length 1.9
  Top Layer w0.3: R23.2 289.178,204.376 289.278,204.276 289.278,203.981 289.652,203.607 289.652,203.438 289.708,203.383 U4.13
NetR24_1: R24.1 U6.3 U8.9 | length 33.9
  Top Layer w0.3: U8.9 287.858,191.44 288.341,191.922 288.341,192.184 R24.1 288.534,192.378 288.534,192.781 v1(289.202,193.449) ; U6.3 294.648,213.926 294.648,212.734 v1(294.678,212.703)
  Bottom Layer w0.3: v1(289.202,193.449) 289.149,193.501 289.149,193.857 286.334,196.672 286.334,211.328 288.9,213.893 293.677,213.893 294.615,212.956 294.615,212.848 294.678,212.785 v1(294.678,212.703)
NetR27_1: R27.1 U6.6 U8.8 | length 29.1
  Top Layer w0.3: U8.8 289.128,191.44 289.535,191.846 289.535,192.27 289.643,192.378 289.643,192.894 v1(290.331,193.583) ; U6.6 292.689,213.934 292.689,212.631 v1(292.705,212.616)
  Bottom Layer w0.3: v1(290.331,193.583) 290.299,193.583 289.594,194.287 289.594,194.319 287.611,196.303 287.611,210.624 289.604,212.616 v1(292.705,212.616)
VCC: C9.1 C10.1 C69.1 D2.2 D15.2 J8.1 U1.2 U1.3 | length 71.5
  Top Layer w0.6: C69.1@301.719,208.743 v1(301.719,210.048) U1.2
  Top Layer w0.8: C69.1 C69.1@301.719,208.743 ; D2.2 304.479,223.638 v1(304.724,223.393) ; v1(304.724,229.847) 310.346,229.847 C9.1 C9.1@311.15,230.651 ; v1(310.49,192.811) 310.49,190.183 310.599,190.074 310.599,189.264 D15.2@311.074,188.789
  Bottom Layer w0.8: J8.1@287.757,222.733 287.757,221.809 288.357,221.209 302.539,221.209 ; v1(304.724,229.847) v1(304.724,223.393) 302.539,221.209 ; v1(310.49,192.811) 310.49,200.254 301.719,209.024 v1(301.719,210.048) 301.719,220.389 302.539,221.209
VCC_2: C8.2 C15.2 J2.2 L2.2 U3.3 U5.3 | length 24.6
  Top Layer w0.3: U5.3 U5.3@300.739,205.818 ; L2.2 L2.2@308.331,196.926
  Top Layer w0.4: U5.3@300.739,205.818 U3.3 307.364,205.818 308.331,204.851
  Top Layer w0.5: L2.2@308.331,196.926 308.331,204.851
  Top Layer w0.8: L2.2 307.619,195.33 308.119,194.83 C15.2 309.868,194.843 312.378,194.843 313.47,193.751 J2.2@313.665,193.751
pads on no net: J3.1 J3.4 J3.6 J3.7 J3.8 U4.6 U4.9 U6.9 U6.10 U6.11 U6.12 U6.13 U6.14 U8.1 U11.3 U11.6 U11.8

## Polygon pours and split planes (outlines as drawn)
GND on Bottom Layer "GND_L02_P014" (solid, pour order 14): 285.417,185.404 299.41,185.393 301.831,182.829 309.917,182.814 309.944,179.188 314.869,179.203 315.248,179.596 315.248,238.176 ccw(c314.948,238.176) 314.706,238.354 cw(c313.498,239.242) 312.609,240.451 ccw(c312.431,240.692) 312.431,240.992 306.33,240.992 306.328,240.872 302.832,237.385 302.814,223.747 301.955,222.937 289.924,222.96 289.126,223.814 289.283,240.992 287.564,240.992 ccw(c287.564,240.692) 287.386,240.451 cw(c286.498,239.242) 285.289,238.354 ccw(c285.048,238.176) 284.748,238.176 284.748,186.076 284.746,186.077
GND_2 on Bottom Layer "GND_2_L02_P008" (solid, pour order 8): 284.711,161.504 ccw(c287.211,161.504) 287.211,159.004 312.711,159.004 ccw(c312.711,161.504) 315.211,161.504 315.211,170.319 314.327,171.37 309.848,171.37 309.848,178.439 308.833,179.607 308.833,181.127 302.523,181.127 299.127,184.513 284.711,184.513 284.711,176.454 ccw(c285.011,176.454) 285.011,176.154 286.461,176.154 cw(c286.461,174.904) 286.461,173.654 285.011,173.654 ccw(c285.011,173.354) 284.711,173.354
GND_ISOL on Bottom Layer "GND_ISOL_L02_P004" (solid, pour order 4): 289.89,236.677 290.97,237.757 300.139,237.757 301.841,236.055 301.841,224.65 301.231,224.041 290.741,224.041 289.89,224.892
GND_2 on Top Layer "GND_2_L01_P010" (solid, pour order 10): 284.711,161.504 ccw(c287.211,161.504) 287.211,159.004 312.711,159.004 ccw(c312.711,161.504) 315.211,161.504 315.211,170.319 314.327,171.37 309.848,171.37 309.848,178.439 308.833,179.607 308.833,181.051 302.6,181.051 299.127,184.513 284.711,184.513 284.711,176.454 ccw(c285.011,176.454) 285.011,176.154 286.461,176.154 cw(c286.461,174.904) 286.461,173.654 285.011,173.654 ccw(c285.011,173.354) 284.711,173.354
GND on Top Layer "GND_L01_P012" (solid, pour order 12): 285.375,185.397 299.368,185.387 301.789,182.823 310.146,182.807 310.173,179.182 314.827,179.197 315.206,179.59 315.206,179.589 315.206,238.169 ccw(c314.906,238.169) 314.664,238.347 cw(c313.456,239.236) 312.567,240.444 ccw(c312.389,240.686) 312.389,240.986 306.288,240.986 306.286,240.866 302.79,237.378 302.772,223.74 301.914,222.931 289.893,222.953 289.186,223.71 289.343,240.986 287.522,240.986 ccw(c287.522,240.686) 287.345,240.444 cw(c286.456,239.236) 285.247,238.347 ccw(c285.006,238.169) 284.706,238.169 284.706,186.069 284.704,186.071
GND_ISOL on Top Layer "GND_ISOL_L01_P002" (solid, pour order 2): 289.908,236.694 291,237.786 300.11,237.786 301.828,236.068 301.828,224.663 301.235,224.07 290.721,224.07 289.908,224.883

## Silkscreen, mask and mechanical layers (free items; w line width, h text height)
Top Overlay:
  drawing of 190 lines, arcs and shapes, not listed
  text "GND" at 286.436,228.346 h1.52 r90
  text "+12V" at 286.461,219.989 h1.52 r90
Bottom Overlay:
  text "B" at 291.262,238.277 h1.52
  text "G" at 295.072,238.252 h1.52
  text "A" at 298.856,238.252 h1.52
  text "VCC" at 309.016,236.195 h1.52 r90
  text "GND" at 304.775,235.991 h1.52 r90
Mechanical 1:
  lines w0.013: 284.75,176.45 ccw(c285.05,176.45) 285.05,176.15 286.5,176.15 cw(c286.5,174.9) 286.5,173.65 285.05,173.65 ccw(c285.05,173.35) 284.75,173.35 284.75,161.5 ccw(c287.25,161.5) 287.25,159 312.75,159 ccw(c312.75,161.5) 315.25,161.5 315.25,173.35 ccw(c314.95,173.35) 314.95,173.65 313.5,173.65 cw(c313.5,174.9) 313.5,176.15 314.95,176.15 ccw(c314.95,176.45) 315.25,176.45 ; 284.75,238.183 cw(c285.05,238.183) 285.292,238.361 ; 287.389,240.458 cw(c287.567,240.7) 287.567,241 312.433,241 cw(c312.433,240.7) 312.611,240.458 ; 314.708,238.361 cw(c314.95,238.183) 315.25,238.183
  lines w0.1: 286.436,184.429 298.856,184.429 298.856,185.141 286.436,185.141 286.436,184.429
  lines w0.254: 289.56,223.672 302.387,223.672 302.387,224.13 289.56,224.13 289.56,223.672

## Text inside footprints (layer, text, board x,y; h text height)
J2: Top Overlay "7" at 310.779,181.127 h1.02 r270; Top Overlay "1" at 313.131,197.46 h1.02 r270
J3: Top Overlay "3" at 299.492,172.158 h1.52; Top Overlay "5" at 305.207,172.158 h1.52; Top Overlay "1" at 293.777,172.285 h1.52; Bottom Overlay "9" at 305.207,164.157 h1.52; Bottom Overlay "7" at 299.619,164.03 h1.52; Bottom Overlay "6" at 296.19,164.03 h1.52; Bottom Overlay "1" at 294.539,171.904 h1.52; Bottom Overlay "3" at 300.254,171.777 h1.52; Bottom Overlay "5" at 305.969,171.777 h1.52
U2: Top Overlay "*" at 291.132,217.867 h1.27 r90; Mechanical 13 "*" at 290.881,219.402 h1.27 r90
U11: Top Overlay "NC" at 305.258,183.439 h0.76 r90; Top Overlay "NC" at 305.258,178.372 h0.76 r90; Top Overlay "Vin" at 305.258,175.832 h0.76 r90; Top Overlay "UWF_S-3WR3" at 307.682,178.098 h0.76 r90; Top Overlay "GND" at 305.258,173.025 h0.76 r90; Top Overlay "0V" at 305.258,188.664 h0.76 r90; Top Overlay "NC" at 305.258,191.13 h0.76 r90; Top Overlay "+Vo" at 305.258,185.601 h0.76 r90